# EAGLE board example (EAGLE 9.6.2)

No outline drawn. Coordinates in mm, seen from the top.
Copper layers used: 

## Placement (x,y rotation side)
D1  []  0,0 0 top
J1  []  0,0 0 top
R1  []  0,0 0 top

## Library data of the parts
D1 J1 R1 = 

## Nets
GND: D1.K
LED: D1.A R1.2